# Altium PCB MyFirstArduino.PcbDoc
Units mil, origin at the board's own origin, x right, y up, seen from the top; angles counter-clockwise.
Board outline 730 x 1700 mil, 6 copper layers (Top Layer, 5V, Signal Layer Top, Signal Layer Bottom, GND, Bottom Layer), stack 48.468 mil thick; 25 components, 41 nets, 165 pads, 73 vias.
Unrouted connection lines stored in the file: 3.
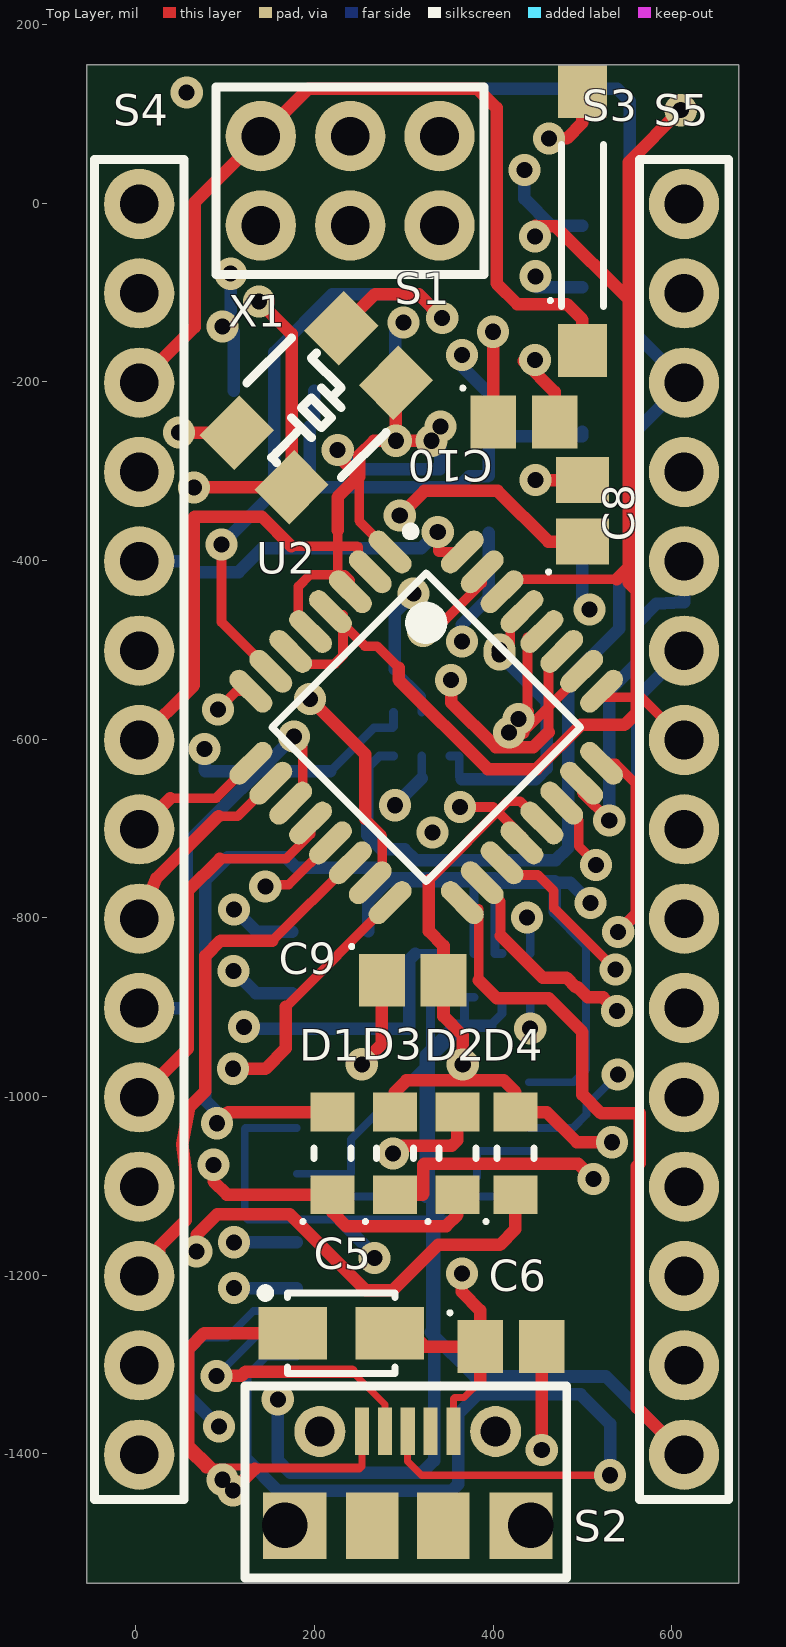
[diagram p0: Top Layer view]
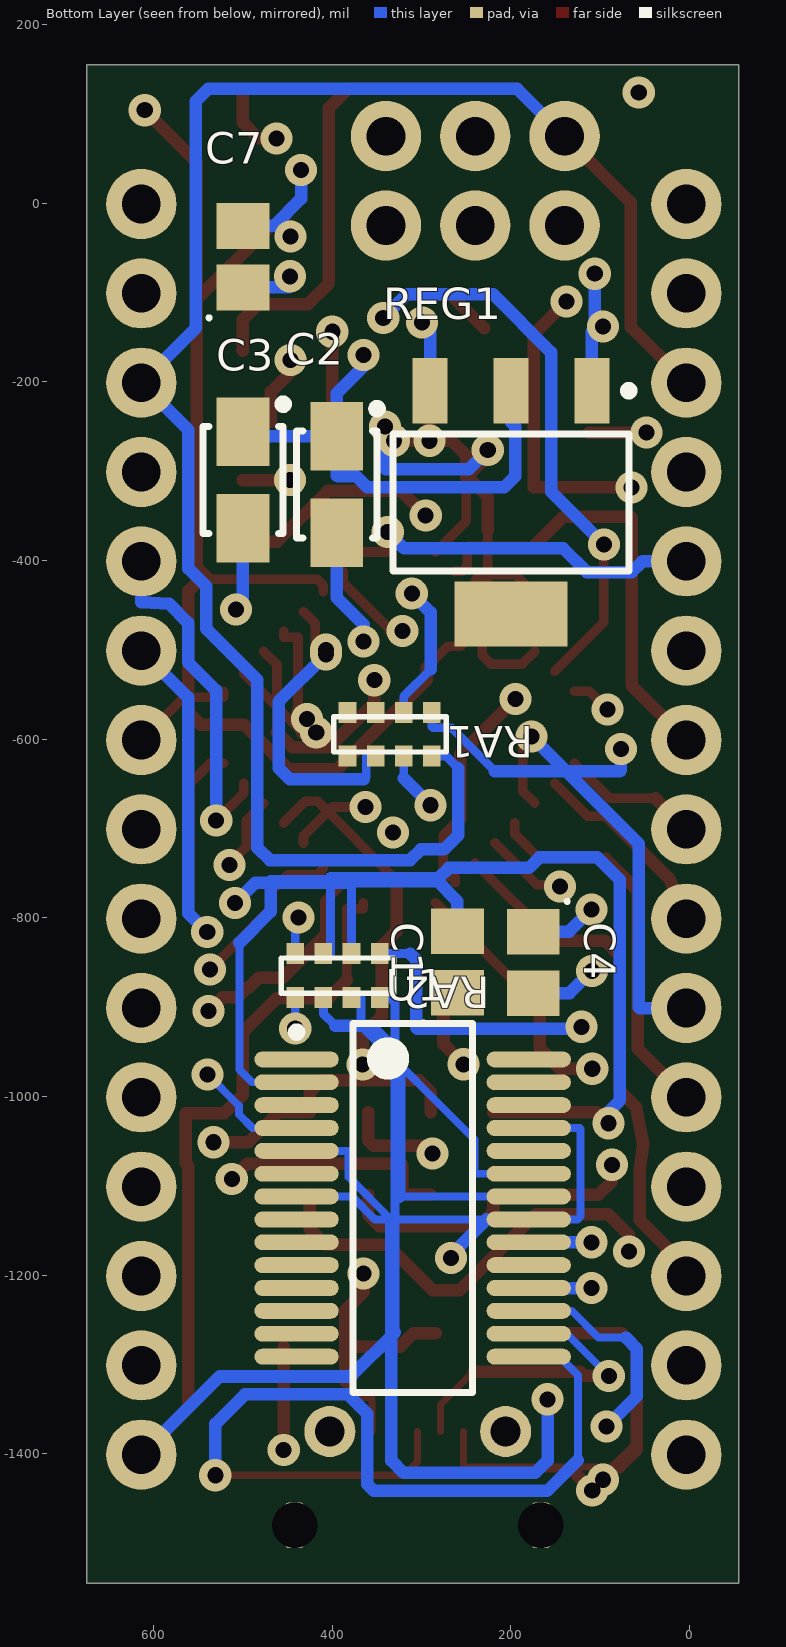
[diagram p1: Bottom Layer view, seen from below]
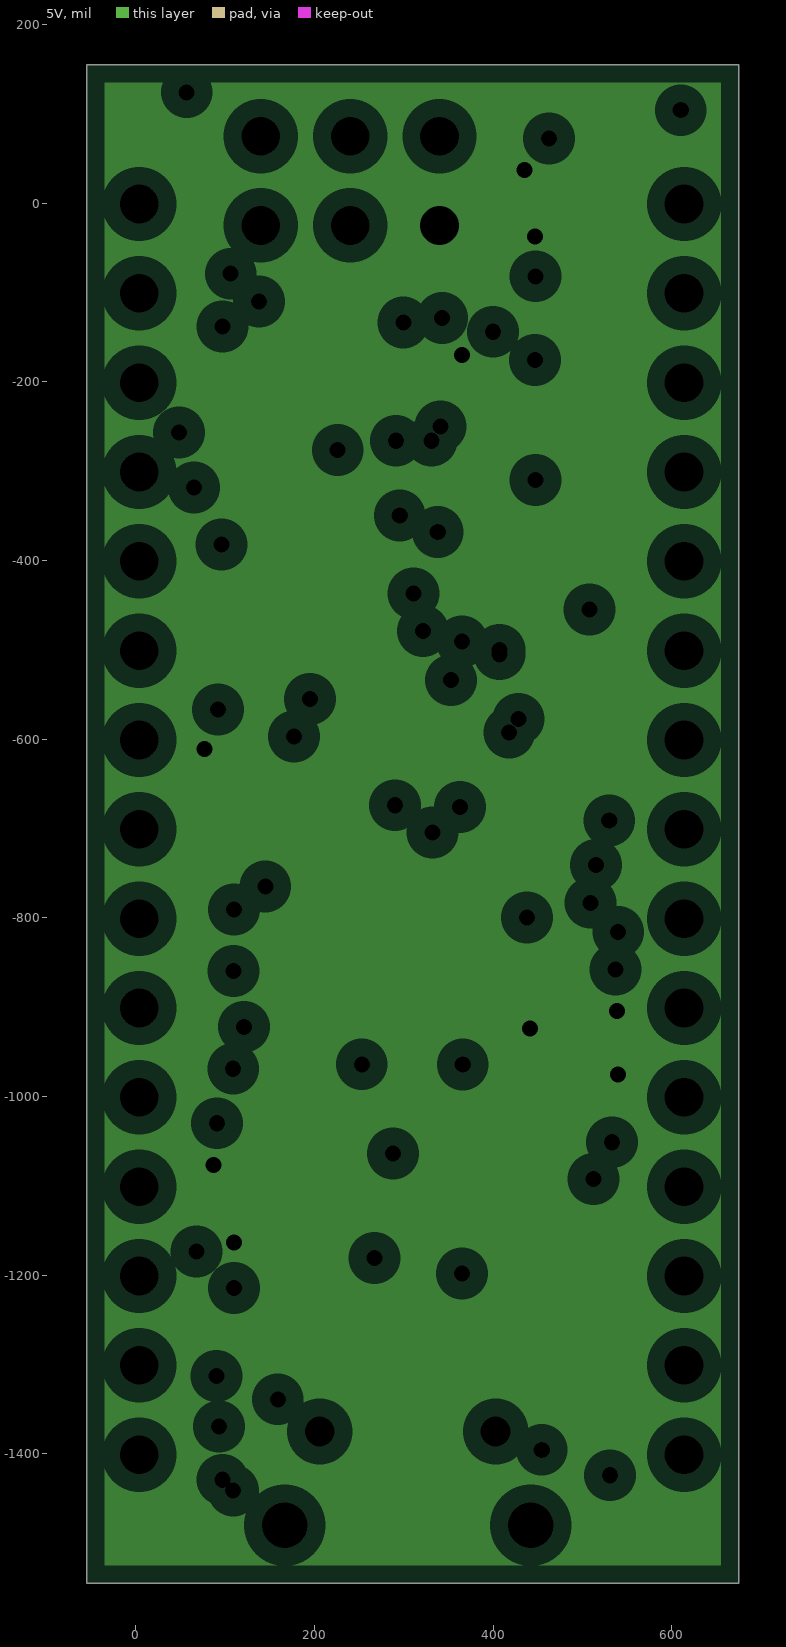
[diagram p2: 5V, clearances drawn from the general rule]
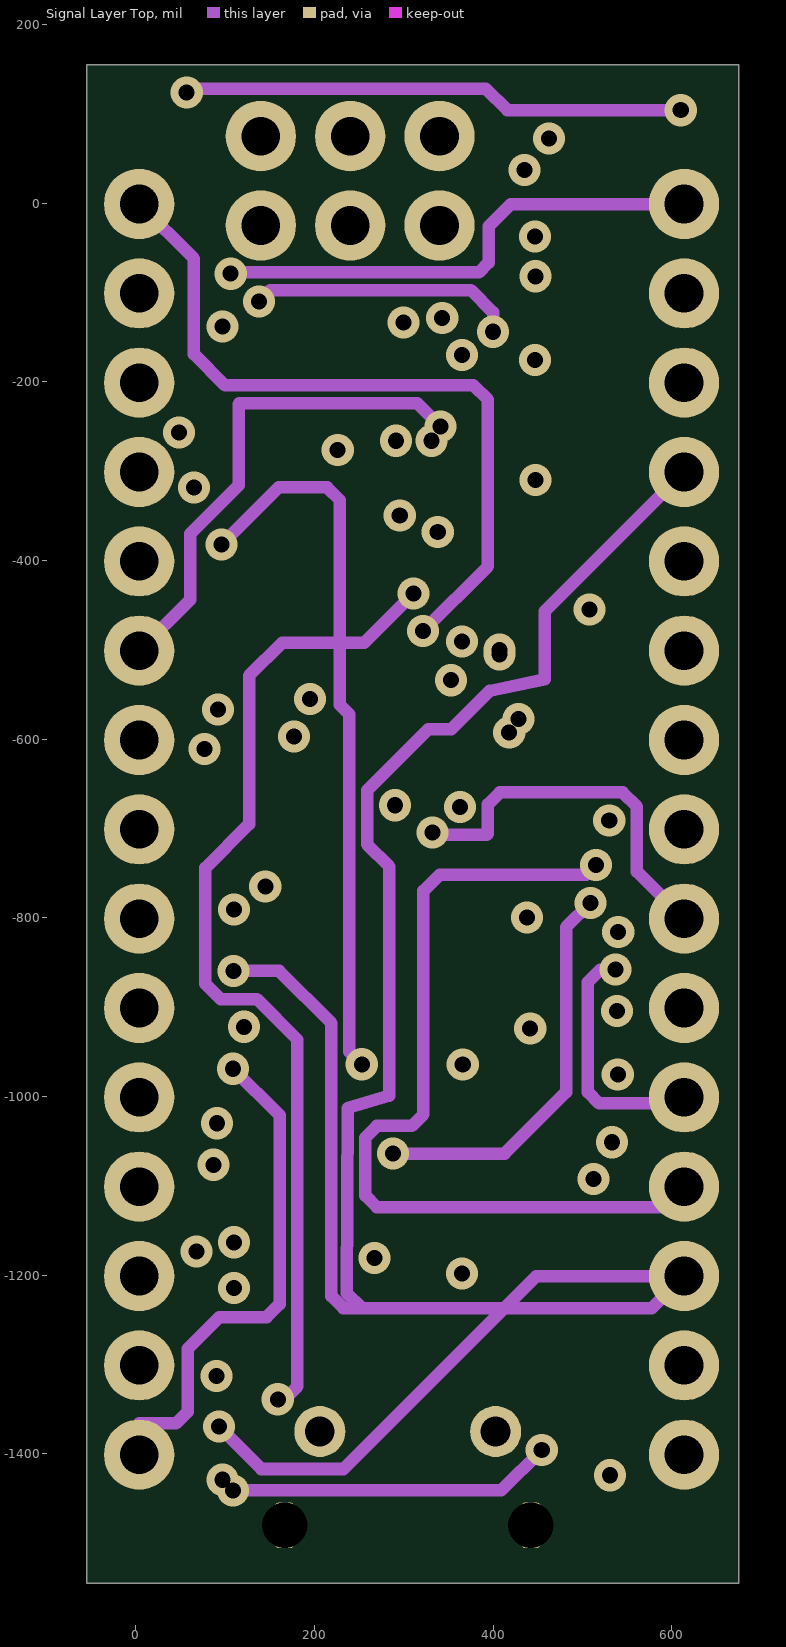
[diagram p3: Signal Layer Top]
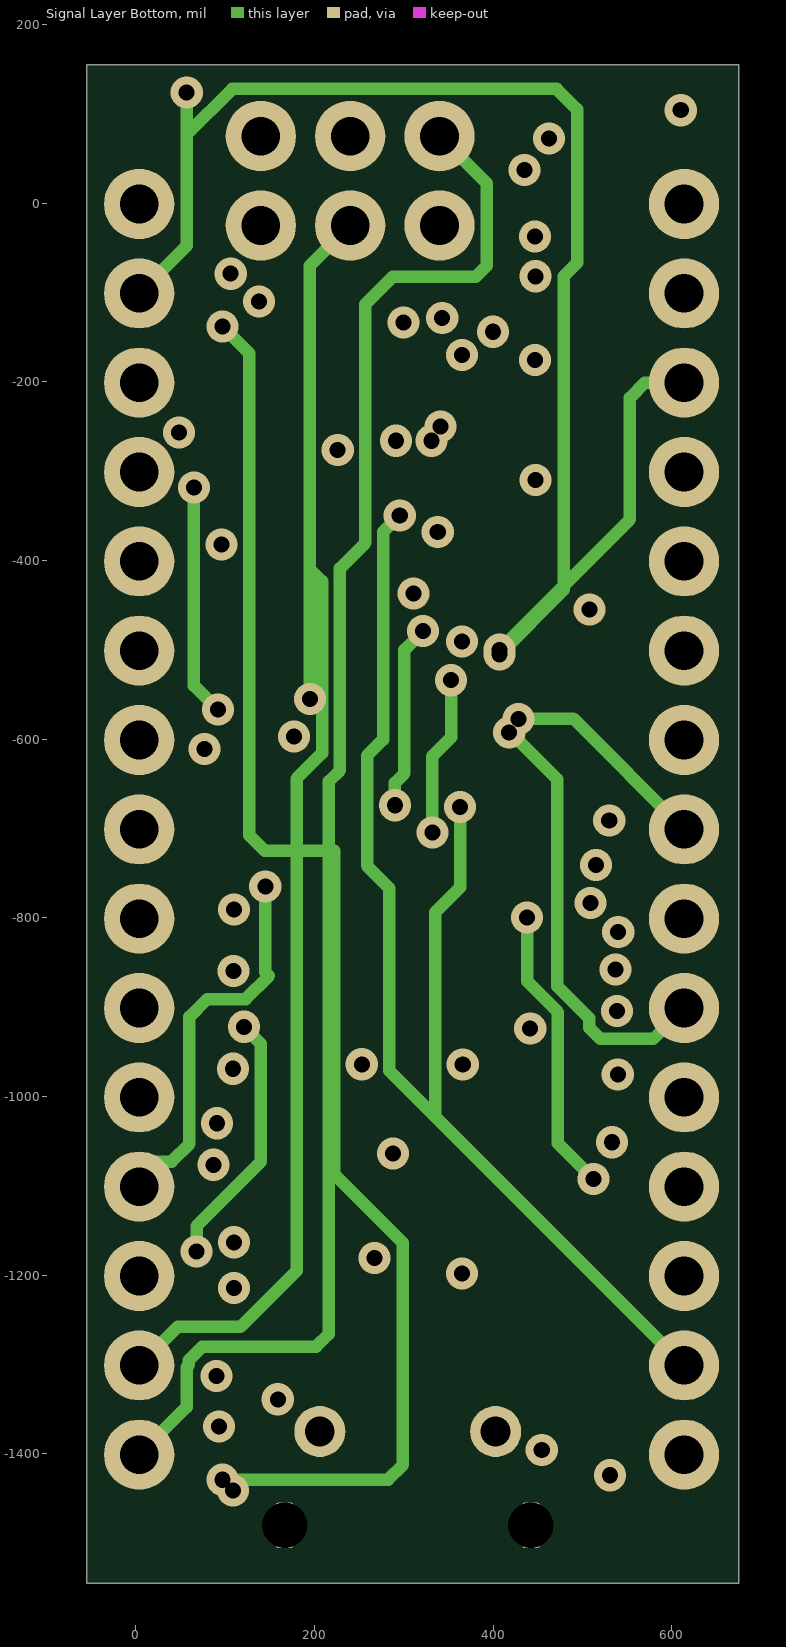
[diagram p4: Signal Layer Bottom]
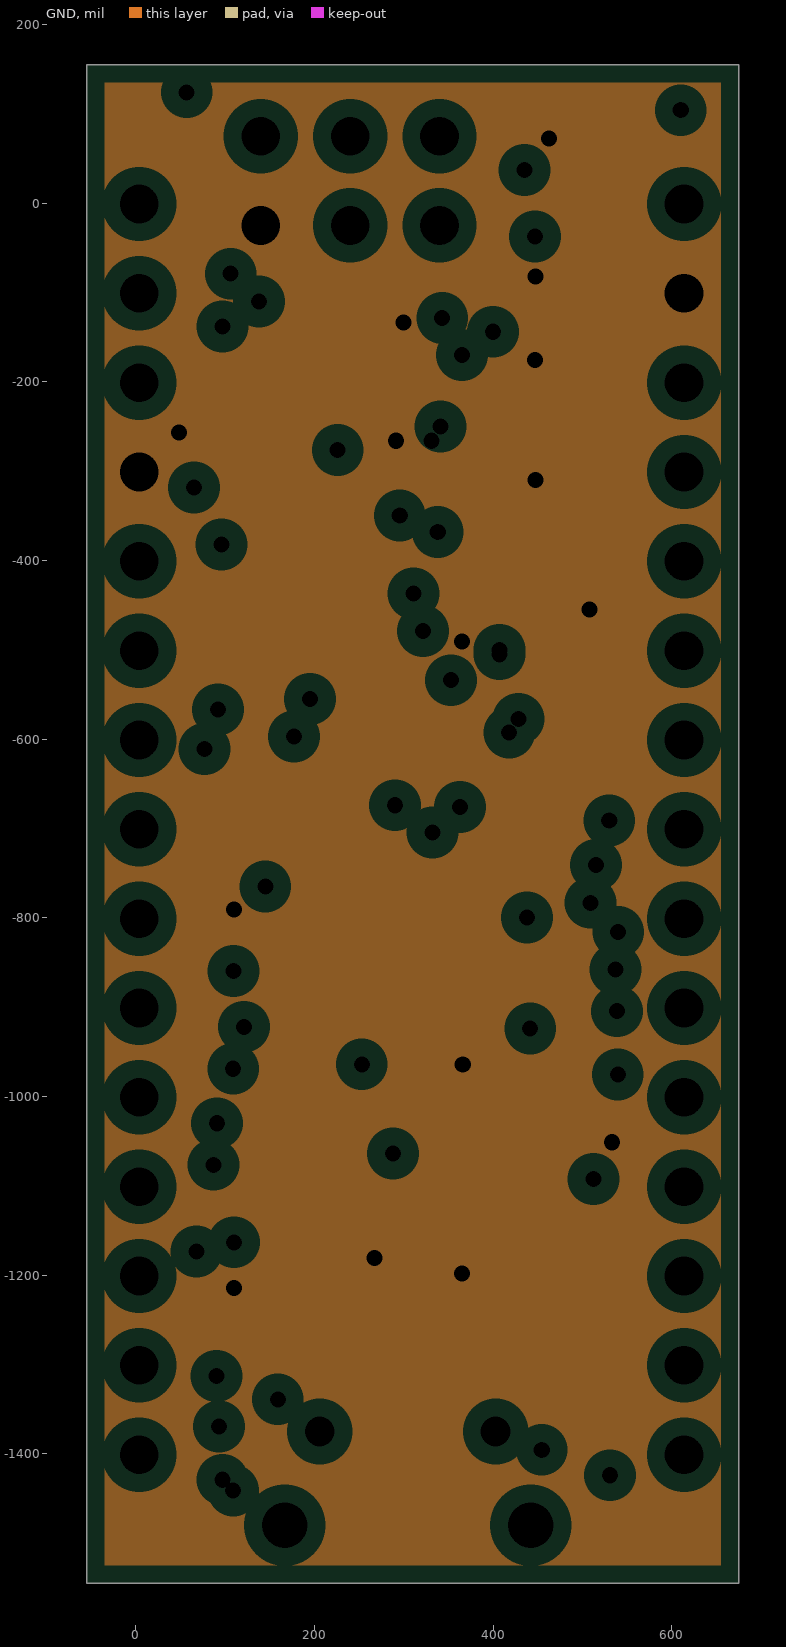
[diagram p5: GND, clearances drawn from the general rule]

## Layer stack, top to bottom
Top Solder: solder mask 0.4, Solder Resist, Dk 3.5
Top Layer: signal copper 1.4
Dielectric 1: core 10, FR-4, Dk 4.2
5V: plane copper 1.417, net 5V
Dielectric 3: core 10, Dk 4.2
Signal Layer Top: signal copper 1.417
Dielectric 4: prepreg 5, Dk 4.2
Signal Layer Bottom: signal copper 1.417
Dielectric 2: core 10, Dk 4.2
GND: plane copper 1.417, net GND
Dielectric 5: prepreg 5, Dk 4.2
Bottom Layer: signal copper 1.4
Bottom Solder: solder mask 0.4, Solder Resist, Dk 3.5

## Board outline
-55,-1545 675,-1545 675,155 -55,155

## Design rules (kind name [scope] priority, off if disabled: settings)
Clearance Clearance_3 [IsBoardOutline  Or IsBoardCutoutRegion vs Hole] p1: gap=39.37 ignorepadtopadclearanceinfootprint=FALSE except(0: Arc-Hole Track-Hole SMDPad-Hole THPad-Hole Via-Hole Fill-Hole Poly-Hole Region-Hole Text-Hole)
Clearance Clearance_2 [IsBoardOutline] p2: gap=19.68 ignorepadtopadclearanceinfootprint=FALSE except(0: Arc-Hole Track-Hole SMDPad-Hole THPad-Hole Via-Hole Fill-Hole Poly-Hole Region-Hole Text-Hole)
Clearance Clearance_1 [OnMid And IsVia] p3: gap=16 ignorepadtopadclearanceinfootprint=FALSE except(0: Arc-Hole Track-Hole SMDPad-Hole THPad-Hole Via-Hole Fill-Hole Poly-Hole Region-Hole Text-Hole)
Clearance [All] p4: gap=6 ignorepadtopadclearanceinfootprint=FALSE except(0: Arc-Hole Track-Hole SMDPad-Hole THPad-Hole Via-Hole Fill-Hole Poly-Hole Region-Hole Text-Hole)
HoleSize [All] p1: absolutevalues=TRUE maxlimit=137 minlimit=9.84 maxpercent=80.000 minpercent=20.000
HoleSize Testpoint [All] p2: absolutevalues=TRUE maxlimit=100 minlimit=1 maxpercent=80.000 minpercent=20.000
HoleSize TestPointUsage [All] p3: absolutevalues=TRUE maxlimit=100 minlimit=1 maxpercent=80.000 minpercent=20.000
HoleToHoleClearance [All] p1: gap=11.81 allowstackedmicrovias=TRUE
MinimumAnnularRing [All] p1: minimumring=6
MinimumSolderMaskSliver [All] p1: minsoldermaskwidth=5
MinimumSolderMaskSliver SilkscreenOverComponentPads [All] p2 off: minsoldermaskwidth=10
NetAntennae [All] p1: netantennaetolerance=10
PlaneClearance [All] p1: clearance=20
PlaneConnect [All] p1: planeconnectstyle=Relief reliefexpansion=20 reliefentries=4 reliefconductorwidth=10 reliefairgap=10
PolygonConnect [All] p1: connectstyle=Relief reliefconductorwidth=10 reliefentries=4 polygonreliefangle="90 Angle" airgapwidth=10
RoutingVias [All] p1: holewidth=18 width=36 viastyle="Through Hole" minholewidth=5.91 minwidth=12 maxholewidth=137 maxwidth=160
SMDNeckDown [All] p1: percent=50.000
SolderMaskExpansion [All] p1: expansion=8
UnConnectedPin [All] p1:
Width [All] p1: maxlimit=200 minlimit=6 preferedwidth=14
24 further rules are at their usual default settings.

## Components (designator, comment, footprint, x,y, rotation, side; value= is the part's Value field where it differs from the comment)
C1 "100nF Ceramic Multilayer Capacitor_1" CAPCP2012X09N 260,-849.45 r90 bottom
C2 "Capacitor SMT Tantalum" "CASE A - 3216X18" 395,-315 r270 bottom value=4.7µF
C3 "Capacitor SMT Tantalum" "CASE A - 3216X18" 500,-310 r270 bottom value=4.7µF
C4 "100nF Ceramic Multilayer Capacitor_1" CAPCP2012X09N 175,-850 r270 bottom
C5 "Capacitor SMT Tantalum" "CASE A - 3216X18" 230,-1265 r0 top value=4.7µF
C6 "100nF Ceramic Multilayer Capacitor_1" CAPCP2012X09N 420,-1280 r0 top
C7 "100nF Ceramic Multilayer Capacitor_1" CAPCP2012X09N 500,-60 r90 bottom
C8 "100nF Ceramic Multilayer Capacitor_1" CAPCP2012X09N 500,-344.45 r90 top
C9 "C0805C180J5GACTU" CAPCP2012X09N 310,-870 r0 top
C10 "C0805C180J5GACTU" CAPCP2012X09N 434.45,-245 r0 top
D1 "Kingbright Green LED, 70 mcd 120 ° 0805" LED1913X12NGREEN 220,-1063.74 r90 top
D2 "Kingbright Red LED, 100 mcd 120 ° 0805" LED1913X12NRED 360,-1063.74 r90 top
D3 "Kingbright Blue LED, 60 mcd 120 ° 0805" LED1913X12NBLUE 290,-1063.74 r90 top
D4 "Kingbright Orange LED, 200 mcd 120 ° 0805" LED1913X12NYEL/ORANGE 425,-1063.74 r90 top
RA1 "1k +- 5% SMT Resistor Array" "1206 RA" 288.5,-614 r0 bottom
RA2 "680+- 5% SMT Resistor Array" "1206 RA" 347.01,-884 r0 bottom
REG1 "LM1117MP-5.0/NOPB, Low Dropout Voltage Regulator, 1.5A, 5 V ±1%, 4-Pin SOT-223" SOT230P700X180-4N 200,-335 r270 bottom
S1 "Programming Headers Dual Row" "ISP HEADER" 1035,-480 r180 top
S2 "NewMolex Right Angle SMT Female Type B Micro USB Connector, 30 V ac, 1.8A" MicroUSB 255.98,-1375 r0 top
S3 "Button Tactile Switch, NO 0.05 A 0.8mm" Button8014X17N 500,-25 r90 top
S4 "connector;str header;single row;.1 cont centers;.095 tail;gold or gtx;36 contact" Header 3.74,-1 r270 top
S5 "connector;str header;single row;.1 cont centers;.095 tail;gold or gtx;36 contact" Header 613.74,-1 r270 top
U1 "FT232RL, Universal Asynchronous Receiver & Transmitter 3MBd, 28-Pin, SSOP" SOP65P780X200-28N 310.08,-1124.84 r180 bottom
U2 "ATMEGA328P-AU" TQFP80P900X900X120-32N 325.09,-586.72 r315 top
X1 "Aker 16MHz Crystal SMT" "Aker S5C Crystal" 230,-140 r45 top value=16MHz

## Footprints (in the part's own frame and the unit in brackets; to place one, negate y for a bottom-side part, rotate by r counter-clockwise, add the part's x,y. Pads: shape width x height; smd on the part's side, far side on the other; paste and mask are expansions set on the pad)
"1206 RA" [mm]
  rect 0.5x0.6 smd: 1(0,0.127) 2(0.8,0.127) 3(1.6,0.127) 4(2.4,0.127) 5(0,-1.118) 6(0.8,-1.118) 7(1.6,-1.118) 8(2.4,-1.118)
  silkscreen extent -0.41,-0.99 2.79,0.01, body extent -0.41,-1.31 2.79,0.29, height 0.5
"Aker S5C Crystal" [mm]
  rect 1.6x1.4 smd: 1(0,0) 2(-4.2,0) 3(0,-2.2) 4(-4.2,-2.2)
  round 0.254 on Top Overlay: 5(-3,-2.4)
  silkscreen extent -4,-3 -1,0.8, body extent -4.7,-2.8 0.5,0.6, height 1
Button8014X17N [mm] "Chip Inductor, 2-Leads, Body 8.00x1.40mm, IPC Medium Density"
  rect 1.5x1.4 smd: 1(-3.556,0) 2(3.81,0)
  silkscreen extent -2.3,-0.6 2.3,0.96, body extent -3.79,-1.92 4.21,1.78, height 2.5
CAPCP2012X09N [mm] "Chip Capacitor, 2-Leads, Body 2.00x1.25mm, IPC Medium Density"
  rect 1.3x1.5 smd: 1(-0.875,0) 2(0.875,0)
  silkscreen extent -1.79,0.91 -1.69,1.01, body extent -1.05,-0.57 0.95,0.68, height 0.78
"CASE A - 3216X18" [mm] "Molded Capacitor, 2-Leads, Body 3.2x1.6mm, IPC Medium Density"
  rect 1.95x1.5 smd: 1(-1.375,0) 2(1.375,0)
  silkscreen extent -2.28,-1.14 1.52,1.27, body extent -1.52,-0.76 1.65,0.84, height 1.77
Header [mm] "SIL Header"
  round 2 hole 1.1: 1(0,0) 2(2.54,0) 3(5.08,0) 4(7.62,0) 5(10.16,0) 6(12.7,0) 7(15.24,0) 8(17.78,0) 9(20.32,0) 10(22.86,0) 11(25.4,0) 12(27.94,0) 13(30.48,0) 14(33.02,0) 15(35.56,0)
  silkscreen extent -1.27,-1.27 36.83,1.27, body extent -1.33,-1.35 36.93,1.35, height 8.6
"ISP HEADER" [mm] "SIL Header for programming"
  round 2 hole 1.1: 1(17.653,-14.097) 2(17.653,-11.557) 3(20.193,-14.097) 4(20.193,-11.557) 5(22.733,-14.097) 6(22.733,-11.557)
  silkscreen extent 16.38,-15.49 24,-10.16, body extent 16.38,-15.37 24,-10.29, height 8
LED1913X12NBLUE [mm] "LED 2-Leads, Body 1.90x1.32mm, IPC Medium Density"
  rect 1.1x1.25 smd: 1(-1.175,0) 2(1.175,0)
  silkscreen extent -1.99,-0.53 0.15,0.89, body extent -1,-0.62 1.02,0.62, height 1.1
LED1913X12NGREEN [mm] "LED 2-Leads, Body 1.90x1.32mm, IPC Medium Density"
  rect 1.1x1.25 smd: 1(-1.175,0) 2(1.175,0)
  silkscreen extent -1.99,-0.53 0.15,0.89, body extent -1.01,-0.62 1.01,0.63, height 1.1
LED1913X12NRED [mm] "LED 2-Leads, Body 1.90x1.32mm, IPC Medium Density"
  rect 1.1x1.25 smd: 1(-1.175,0) 2(1.175,0)
  silkscreen extent -1.99,-0.53 0.15,0.89, body extent -1.02,-0.43 1.04,0.47, height 0.85
LED1913X12NYEL/ORANGE [mm] "LED 2-Leads, Body 1.90x1.32mm, IPC Medium Density"
  rect 1.1x1.25 smd: 1(-1.175,0) 2(1.175,0)
  silkscreen extent -1.99,-0.53 0.15,0.89, body extent -1.01,-0.62 1.01,0.63, height 1.1
MicroUSB [mm] "MicroUSB  Molex 5Pin"
  rect 0.4x1.35 smd: 1(-0.07,0) 2(0.58,0) 3(1.23,0) 4(1.88,0) 5(2.53,0)
  rrect50% 0.6x1.3 hole 1.3: ""(-2.27,-2.667) ""(-2.27,-2.667) ""(4.73,-2.667)
  rect 1.8x1.9 smd: ""(-1.98,-2.678) ""(4.45,-2.678)
  round 1.45 hole 0.85: ""(-1.27,0) ""(3.73,0)
  rect 1.5x1.9 smd: ""(0.218,-2.678) ""(2.242,-2.678)
  silkscreen extent -3.39,-4.17 5.75,1.3, body extent -2.83,-5.32 5.37,0.11, height 2.68
SOP65P780X200-28N [mm] "SOP, 28-Leads, Body 10.20x5.30mm, Pitch 0.65mm, IPC Medium Density"
  oval 2.4x0.45 smd: 1(-3.3,4.225) 2(-3.3,3.575) 3(-3.3,2.925) 4(-3.3,2.275) 5(-3.3,1.625) 6(-3.3,0.975) 7(-3.3,0.325) 8(-3.3,-0.325) 9(-3.3,-0.975) 10(-3.3,-1.625) 11(-3.3,-2.275) 12(-3.3,-2.925) 13(-3.3,-3.575) 14(-3.3,-4.225) 15(3.3,-4.225) 16(3.3,-3.575) 17(3.3,-2.925) 18(3.3,-2.275) 19(3.3,-1.625) 20(3.3,-0.975) 21(3.3,-0.325) 22(3.3,0.325) 23(3.3,0.975) 24(3.3,1.625) 25(3.3,2.275) 26(3.3,2.925) 27(3.3,3.575) 28(3.3,4.225)
  silkscreen extent -3.43,-5.25 1.7,5.25, body extent -3.91,-5.1 3.91,5.1, height 2
SOT230P700X180-4N [mm] "SOT223, 4-Leads, Body 6.50x7.00mm (avg), Pitch 2.30mm, IPC Medium Density"
  rect 1.85x1 smd: 1(-3.175,2.3) 2(-3.175,0) 3(-3.175,-2.3)
  rect 1.85x3.2 smd: 4(3.175,0)
  silkscreen extent -3.3,-3.35 1.95,3.47, body extent -3.8,-3.12 3.29,3.38, height 1.65
TQFP80P900X900X120-32N [mm] "TQFP, 32-Leads, Body 7.00x7.00mm, Pitch 0.80mm, IPC Medium Density"
  oval 1.5x0.55 smd: 1(-4.25,2.8) 2(-4.25,2) 3(-4.25,1.2) 4(-4.25,0.4) 5(-4.25,-0.4) 6(-4.25,-1.2) 7(-4.25,-2) 8(-4.25,-2.8) 17(4.25,-2.8) 18(4.25,-2) 19(4.25,-1.2) 20(4.25,-0.4) 21(4.25,0.4) 22(4.25,1.2) 23(4.25,2) 24(4.25,2.8)
  oval 0.55x1.5 smd: 9(-2.8,-4.25) 10(-2,-4.25) 11(-1.2,-4.25) 12(-0.4,-4.25) 13(0.4,-4.25) 14(1.2,-4.25) 15(2,-4.25) 16(2.8,-4.25) 25(2.8,4.25) 26(2,4.25) 27(1.2,4.25) 28(0.4,4.25) 29(-0.4,4.25) 30(-1.2,4.25) 31(-2,4.25) 32(-2.8,4.25)
  silkscreen extent -4.37,-3.1 3.1,3.75, body extent -3.5,-3.5 3.5,3.5, height 1.2

## Part data
C1 C4 C6 C7 C8: "AVX 0805 Standard 100nF Ceramic Multilayer Capacitor, 50 V dc X7R Dielectric ±10% SMD", Capacitance=100nF, Manufacturer=AVX, Package=0805, Voltage=50V, Creator="Ritesh Kanjee", Datasheet URL=http://za.rs-online.com/web/p/ceramic-multilayer-capacitors/4646688/, Date Created="18 February 2015", RS Stock No.=464-6688
C2 C3 C5: library part "4.7µF Tant RS 496-3545", "Capacitor,tantalum,SMT,16V,4.7uF,10%,A-case", Package=3216-18, Tolerance=10%, Voltage=16V, ComponentLink1Description="Supplier Website", ComponentLink1URL=http://za.rs-online.com/web/search/searchBrowseAction.html?method=getProduct&R=4963545, ComponentLink2Description="RS Data sheet", ComponentLink2URL=http://docs-europe.origin.electrocomponents.com/webdocs/04ed/0900766b804ed4cc.pdf, LatestRevisionDate=28-April-2010, Part Originator="H Theron", Publisher=DPSS, RS Stock Nr.=496-3545
C9 C10: library part "18pF Ceramic Multilayer Capacitor, 50 V dc C0G Dielectric ±5% SMD", "18pF Ceramic Multilayer Capacitor, 50 V dc C0G Dielectric ±5% SMD", Capacitance=18pF, Manufacturer=Kemet, Package=0805, Voltage=50V, Creator="Ritesh Kanjee", Datasheet URL=http://za.rs-online.com/web/p/ceramic-multilayer-capacitors/6480935/?searchTerm=C0805C180J5GACTU&relevancy-data=636F3D3226696E3D4931384E4B6E6F776E41734D504E266C753D656E266D6D3D6D61746368616C6C7061727469616C26706D3D5E5B5C707B4C7D5C707B4E647D2D2C2F255C2E5D2B2426706F3D313326736E3D592673743D4D414E5F504152545F4E554D4245522677633D424F5448267573743D4330383035433138304A35474143545526, Date Created="18 February 2015", RS Stock No.=648-0935
D1: Color=Green, Forward Voltage="2.1 V", Manufacturer=KingBright, Manufacturer Part No.=KP-2012MGC, Creator="Ritesh Kanjee", Datasheet URL=http://za.rs-online.com/web/p/visible-leds/4663778/, Date Created="18 February 2015", RS Stock No.=466-3778
D2: Color=RED, Forward Voltage=1.85V, Manufacturer=KingBright, Manufacturer Part No.=KP-2012SRC-PRV, Creator="Ritesh Kanjee", Datasheet URL=http://za.rs-online.com/web/p/visible-leds/4663813/, Date Created="18 February 2015", RS Stock No.=466-3813
D3: Color=Blue, Forward Voltage=3.2V, Manufacturer=KingBright, Manufacturer Part No.=KP-2012PBC-A, Creator="Ritesh Kanjee", Datasheet URL=http://za.rs-online.com/web/p/visible-leds/4663784/, Date Created="18 February 2015", RS Stock No.=466-3784
D4: Color=Orange, Forward Voltage=1.85V, Manufacturer=KingBright, Manufacturer Part No.=KP-2012SEC, Creator="Ritesh Kanjee", Datasheet URL=http://za.rs-online.com/web/p/visible-leds/4663790/, Date Created="18 February 2015", RS Stock No.=466-3790
RA1: "1k +- 5% SMT Resistor Array 4 Res", Manufacturer=Bourns, Manufacturer Part No.=CAY16-102J4LF, Creator="R Kanjee", Date Created="25 February 2015", RS Stock No.=552-5579, Wattage=0.25W
RA2: library part "680 +- 5% SMT Resistor Array 4 Res 1206", "680 +- 5% SMT Resistor Array 4 Res 1206", Manufacturer=Bourns, Manufacturer Part No.=CAY16-681J4LF, Creator="R Kanjee", Date Created="25 February 2015", RS Stock No.=552-5579, Wattage=0.25W
REG1: library part LM1117MP-5.0, Manufacturer="Texas Instruments", Maximum Input Voltage=15V, Output Voltage=5V, Supply Current=1.5Amps, Created By="R Kanjee", Datasheet URL=http://za.rs-online.com/web/p/low-dropout-voltage-regulators/5339583/, Date Created="26 February 2015", RS Stock No.=533-9583
S1: library part "Programming ISP, Programming Headers Dual Row", Current Rating="3Amps Continuous", Manufacturer=FCI, Manufacturer Part No.=68000-236HLF, Created By="R Kanjee", Date Created="1 March 2015", RS Stock No.=2509565626
S2: library part "Micro USB Connector, 30 V ac, 1.8A", Manufacturer=Molex, Manufacturer Part No.=105017-0001, Max Current=1.8A, Max Voltage=30V, Creator="R Kanjee", Datasheet URL=http://za.rs-online.com/web/p/micro-usb-connectors/8486764/, Date Created="28 February 2015", RS Stock No=848-6764
S3: Manufacturer="C & K", Manufacturer Part No.=B3F1000, Creator="R Kanjee", Date Created="25 February 2015", RS Stock No.=516-255, State="Normaly Open"
S4 S5: library part "Single row; PCB headers", Current Rating="3Amps Continuous", Manufacturer=FCI, Manufacturer Part No.=68000-236HLF, Created By="R Kanjee", Date Created="1 March 2015", RS Stock No.=2509565626
U1: library part "FT232RL USB to UART, Universal Asynchronous Receiver & Transmitter 3MBd, 28-Pin, SSOP", Manufacturer="FTDI Chip", Manufacturer Part No.=FT232RL, Creator="R Kanjee", Date Created="03 March 2015", Pin Count=28, RS Stock No.=406-580
U2: "Microchip Technology ATMEGA328P-AU, 8bit AVR Microcontroller, 20MHz, 32 kB Flash, 32-Pin TQFP", Create Date=2018, Created By="altay brusan", Datasheet URL=https://docs-emea.rs-online.com/webdocs/15b8/0900766b815b8e7b.pdf, RS Stock No.=131-0271
X1: library part "Aker  C5S-16.000-12-3030-X", "Aker S5C SMT Crystal", Frequency Stability=+/-30ppm, Load Capacitance=12pF, Manufacturer=Aker, Manufacturer Part #=C5S-16.000-12-3030-X, Package="3.2x5mm SMD", Creator="R Kanjee", HelpURL=http://za.rs-online.com/web/p/crystal-units/6719488/, RS="RS 671-9488", RS Stock Nr.=671-9488, Supplier=RS

## Via types
v1: diameter 36, hole 18, Top Layer to Bottom Layer, 73 vias

## Nets (pads, with @x,y where several pads share a name; then routed paths per layer and width w, separated by ;. In a path a pad name is that pad's centre, name@x,y a point inside that pad or via, vN(x,y) a via of type N, cw(c..) or ccw(c..) an arc to the next point about the centre after c; other vN are vias at no path point)
3V3: C4.2 S5.4 S5.13 U1.17 | length 2975
  Signal Layer Top w14: v1(93,-1369.5) 140.5,-1417 232.5,-1417 412.5,-1237 ; v1(109.5,-859.5) 160.5,-859.5 219,-918 219,-1223.5 232.5,-1237 253,-1237 ; S5.4 458,-456.74 458,-533 396,-546 353.15,-588.85 327.65,-588.85 259,-657.5 259,-717.75 284,-742.75 284,-999 237,-1013 236,-1220 253,-1237 ; 253,-1237 412.5,-1237 ; 412.5,-1237 577.74,-1237 S5.13 448.5,-1201 412.5,-1237
  Bottom Layer w8.86: 71.5,-1270 102,-1270 132,-1240 U1.17
  Bottom Layer w14: 71.5,-1270 59,-1282.5 59,-1335.5 v1(93,-1369.5) ; v1(109.5,-859.5) 134.45,-884.45 C4.2
5V: C2.1 C3.1 C7.2 D1.1 D2.1 RA1.5 RA2.4 REG1.2 S1.2 U1.4 U1.20 U2.4 U2.6 U2.18 | length 2966.2
  Top Layer w10.83: U2.6 187.56,-516 222.36,-516 232,-506.36 U2.4@232,-471.36 ; 294.34,-520 270.24,-495.91 256.55,-495.91 U2.4@232,-471.36 ; U2.18 408.34,-781.32 408.34,-820 ; U2.4@221.64,-461 217.91,-461 U2.4 U2.4@221.64,-461 ; U2.4@221.64,-461 U2.4@232,-471.36 ; U2.4@221.64,-461 232,-461 U2.4@232,-471.36
  Top Layer w14: v1(87.07,-1076.5) 87.07,-1095 102.07,-1110 D1.1 220,-1129.5 235.5,-1145 347.5,-1145 360,-1132.5 D2.1 ; 294.34,-520 294.34,-533.7 394.14,-633.5 448.82,-633.5 498.32,-584 547,-584 561,-570 561,-434 552,-425 552,-108 470,-26 447.5,-26 447,-25.5 v1(447,-37.5) ; 408.34,-820 455.34,-867 482,-867 493,-878 495,-878 506,-889 523,-889 v1(538.5,-904.5)
  Bottom Layer w8.86: U1.4 489.36,-1035.28 504.64,-1020 504.64,-1010.28 v1(539.57,-975.34)
  Bottom Layer w9.84: 217.92,-636 266.64,-587.28 287.22,-587.28 288.5,-586 RA1.5 ; v1(441.5,-923.81) RA2.4
  Bottom Layer w14: v1(77,-611) 77,-635 78,-636 217.92,-636 ; v1(109.91,-1163.23) U1.20 ; REG1.2 200,-245 195,-250 195,-305.5 207.5,-318 361,-318 373,-306 394,-306 395,-305 C2.1 ; v1(365,-170.15) 365,-182.65 395,-212.65 C2.1 ; v1(434.97,36.95) 434.97,5 465.52,-25.55 C7.2 ; C3.1 500,-261 448,-261 447.87,-260.87 C2.1
A0: S5.5 U2.23 | length 395.8
  Top Layer w10.83: U2.23 499.08,-660.08 v1(530,-691)
  Bottom Layer w14: v1(530,-691) 530,-545.37 561.37,-514 561.37,-469.76 582.5,-448.63 613.74,-447 S5.5
A1: S5.6 U2.24 | length 567.5
  Top Layer w10.83: U2.24 537.09,-627.09 559.41,-649.41 559.41,-796.59
  Top Layer w14: v1(540,-816) 559.41,-796.59
  Bottom Layer w14: v1(540,-816) 561.37,-794.63 561.37,-553.37 S5.6
A2: S5.7 U2.25 | length 118.9
  Top Layer w10.83: U2.25 521.36,-553 565.74,-553 S5.7
A3: S5.8 U2.26 | length 373.8
  Top Layer w10.83: v1@433.5,-592.58 499.08,-527 U2.26
  Top Layer w14: v1(418,-592.58) v1@433.5,-592.58
  Signal Layer Bottom w14: v1(418,-592.58) 418,-577 489.74,-577 S5.8
A4: S5.9 U2.27 | length 861.6
  Top Layer w10.83: 462,-592.03 462,-516.63 U2.27
  Top Layer w14: v1(353,-534) 353,-559 403,-609 445.03,-609 462,-592.03
  Signal Layer Top w14: v1(332,-704.5) 331.58,-704.92 332,-704.92 332,-706 333,-707 393,-707 394,-706 394,-673.09 407.5,-659.59 545,-659.59 561,-675.59 561,-748.26 S5.9
  Signal Layer Bottom w14: v1(332,-704.5) 332,-619.07 353,-598.07 v1(353,-534)
A5: S5.10 U2.28 | length 623.2
  Top Layer w10.83: v1@438.5,-569.5 438.5,-486 454.54,-486 U2.28
  Top Layer w14: v1(428.5,-577.5) 430.5,-577.5 v1@438.5,-569.5
  Signal Layer Bottom w14: v1(428.5,-577.5) 428.5,-601.5 472,-645 472,-876.71 507.5,-912.21 507.5,-923 520,-935.5 579.24,-935.5 S5.10
A6: S5.11 U2.19 | length 467.1
  Top Layer w10.83: U2.19 410,-745 417,-752 450,-752 468,-770 468,-789 v1(537,-858)
  Signal Layer Top w14: v1(537,-858) 520,-858 506,-872 506,-995 518.74,-1007.74 607,-1007.74 S5.11
A7: S5.12 U2.22 | length 1066.1
  Top Layer w10.83: U2.22 496,-690.82 496,-720 v1@515,-739
  Top Layer w14: v1(515,-741) v1@515,-739
  Signal Layer Top w14: v1(515,-741) 504,-752 340,-752 322,-770 322,-1020 309,-1033 270,-1033 257,-1046 257,-1111 270,-1124 613.74,-1124 S5.12
AREF: C8.1 S5.14 U2.20 | length 1801.4
  Top Layer w10.83: v1(363,-676) 400,-676 432.27,-708.27 U2.20
  Top Layer w14: v1(295.5,-349.5) 323,-322 405,-322 461.9,-378.9 C8.1
  Signal Layer Bottom w14: v1(295.5,-349.5) 277,-368 277,-600.46 259,-618.46 259,-742 284,-767 284,-971.26 335,-1022.26 ; v1(363,-676) 363,-766 335,-794 335,-1022.26 ; S5.14 335,-1022.26
D0/RX: RA1.3 S4.2 U2.30 | length 2905.4
  Top Layer w10.83: U2.30 410,-428 417,-421 538.5,-421
  Top Layer w14: 538.5,-421 552,-407.5 552,46 v1(610,104)
  Signal Layer Top w14: v1(57,124) 61,128 392,128 416,104 v1(610,104)
  Signal Layer Bottom w14: S4.2 57,-47.74 57,77 ; v1(57,124) 57,77 ; v1(407,-505) 479,-433 479,-82 494,-67 494,105 471,128 108,128 57,77
  Bottom Layer w9.84: RA1.3 361.5,-619 362,-619.5 362,-642 365,-645
  Bottom Layer w14: 365,-645 447.5,-645 460,-632.5 460,-558 v1(407,-505)
D1/TX: RA1.2 S4.1 U2.31 | length 1209
  Top Layer w10.83: v1@334,-479 387.73,-425.27 U2.31
  Top Layer w14: v1(321.5,-479) v1@334,-479
  Signal Layer Top w14: S4.1 65,-62.26 65,-169 100,-204 378,-204 394,-220 394,-406.5 v1(321.5,-479)
  Signal Layer Bottom w14: v1(290,-674) 290,-649 300.54,-638.46 300.54,-499.96 v1(321.5,-479)
  Bottom Layer w9.84: 320,-644 RA1.2
  Bottom Layer w14: v1(290,-674) 320,-644
D2: S4.5 U2.32 | length 407.2
  Top Layer w10.83: v1(338,-368) 338,-389.46 339,-390.46 U2.32
  Bottom Layer w14: S4.5 53,-401 65,-413 115,-413 141.5,-386.5 319.5,-386.5 v1(338,-368)
D3: S4.6 U2.1 | length 868.5
  Top Layer w10.83: 250,-306.5 250,-355.73 U2.1
  Top Layer w14: v1(226,-276.5) 226,-282.5 250,-306.5
  Signal Layer Top w14: S4.6 61,-443.74 61,-370 114.99,-316.01 114.99,-225 115.99,-224 315,-224 v1(341,-250)
  Bottom Layer w14: v1(226,-276.5) 247.25,-297.75 340,-297.75 341,-296.75 v1(341,-250)
D4: S4.7 U2.2 | length 511.1
  Top Layer w10.83: 174,-384 248,-384 249,-385 249,-407 254,-412 262.45,-412 U2.2
  Top Layer w14: S4.7 65,-539.74 65,-352 66,-351 141,-351 174,-384
D5: S4.8 U2.9 | length 155.7
  Top Layer w10.83: 38.65,-666.09 89.82,-666.09 U2.9
  Top Layer w14: S4.8 38.65,-666.09
D6: S4.9 U2.10 | length 221.3
  Top Layer w10.83: 92.62,-686.18 114.28,-686.18 U2.10
  Top Layer w14: S4.9 22.91,-755.89 92.62,-686.18
D7: S4.10 U2.11 | length 496.1
  Top Layer w10.83: U2.11 187,-658 v1@187,-598
  Top Layer w14: v1(177,-597) 186,-597 v1@187,-598
  Bottom Layer w14: S4.10 56,-901 57,-900 57,-717 v1(177,-597)
D8: S4.11 U2.12 | length 429.9
  Top Layer w10.83: 94.09,-733.91 168.09,-733.91 195.64,-706.36 U2.12
  Top Layer w14: S4.11 58,-946.74 58,-770 94.09,-733.91
D9: S4.12 U2.13 | length 537.4
  Top Layer w10.83: v1@150,-763 171.08,-763 U2.13
  Top Layer w14: v1(145,-765) 147,-763 v1@150,-763
  Signal Layer Bottom w14: S4.12 3.74,-1073 40,-1073 60,-1053 60,-911 80,-891 123,-891 149,-865 145,-861 v1(145,-765)
D10: S4.13 U2.14 | length 606.9
  Top Layer w10.83: 153,-825.63 U2.14
  Top Layer w14: S4.13 26,-1201 26,-1168.52 56.11,-1138.41 56.11,-1083.11 52,-1053.5 60,-1011.87 78,-993.87 78,-842.63 95,-825.63 153,-825.63
D11/MOSI: S1.4 S4.14 U2.15 | length 1824.1
  Top Layer w10.83: 257,-689 276,-708 276,-754 262.45,-754 U2.15
  Top Layer w14: v1(195,-555) 257,-617 257,-689
  Signal Layer Bottom w14: S4.14 46.74,-1258 117.18,-1258 180,-1195.18 180,-644.18 208.5,-615.68 208.5,-423.52 195,-410.02 ; v1(195,-555) 195,-410.02 ; S1.4 195,-70 195,-410.02
D12/MISO: S1.1 S4.15 U2.16 | length 2642.1
  Top Layer w10.83: 168,-899.71 U2.16
  Top Layer w14: v1(109,-969) 145,-969 168,-946 168,-899.71
  Signal Layer Top w14: S4.15 3.74,-1366 45,-1366 58,-1353 58,-1282.5 93.5,-1247 146.5,-1247 161,-1232.5 161,-1021 v1(109,-969)
  Signal Layer Bottom w14: S4.15 57,-1347.74 57,-1303 59.5,-1300.5 59.5,-1295 74.5,-1280 202,-1280 216,-1266 216,-647.36 228.5,-634.86 228.5,-408.86 257,-380.36 257,-113 287.5,-82.5 380.5,-82.5 393,-70 393,22 S1.1
D13/SCK: RA2.1 S1.3 S5.15 U2.17 | length 1522.3
  Top Layer w10.83: U2.17 365.46,-790 384,-790 384,-870
  Top Layer w14: 384,-870 404,-890 462,-890 500,-928 500,-997.84 521,-1018.84 563.84,-1018.84 564,-1019 564,-1075 561,-1078 561,-1348.26 S5.15
  Bottom Layer w9.84: 330,-1264 330,-895 336,-889 RA2.1
  Bottom Layer w14: 330,-1264 379.46,-1313.46 526.2,-1313.46 S5.15
GND: C2.2 C3.2 C4.1 C5.2 C6.1 C7.1 C8.2 C9.2 C10.2 D3.2 D4.2 REG1.3 S1.6 S2.5 S3.2 S4.4 S5.2 U1.7 U1.18 U1.21 U1.25 U2.3 U2.5 U2.21 X1.2 X1.3 | length 2842
  Top Layer w7.87: S2.5 355.59,-1338 356.59,-1337 367.55,-1337 385.55,-1319
  Top Layer w10.83: U2.5 182,-465.9 182,-429 195,-416 U2.3@226,-416 ; 226,-366 U2.3@226,-416 ; 328,-758 416.59,-669.41 430.05,-669.41 U2.21 ; U2.3@226,-416 226,-420.82 U2.3 240.18,-422.18 234,-416 U2.3@226,-416
  Top Layer w14: v1(48.32,-256.92) X1.2 ; 226,-366 226,-329 250,-305 250,-282.5 266.5,-266 v1(291.24,-266.01) ; C5.2 309,-1265 324,-1280 C6.1 ; D3.2 290,-995 303,-982 412,-982 425,-995 D4.2 459.92,-1017.48 493.68,-1051.24 v1(532.93,-1051.24) ; X1.3 v1(291.24,-266.01) ; 328,-758 328,-815 344.45,-831.45 C9.2 344.45,-910.16 366,-931.71 v1(366,-964.36) ; v1(331,-266) v1(291.24,-266.01) ; v1(365,-1198.14) 365,-1218.79 385.55,-1239.34 C6.1 ; 385.55,-1319 C6.1 ; v1(446.95,-175.64) 435,-175.64 434.45,-176.2 434.45,-176.84 468.9,-211.29 C10.2 ; v1(447.47,-310) C8.2 ; v1(462.5,72.47) 482.5,72.47 500,89.97 S3.2
  Bottom Layer w8.86: U1.25 123,-1035.28 122,-1036.28 122,-1134 125.64,-1137.64 U1.21 227.2,-1137.64 352.41,-1137.64 378,-1112.05 U1.7
  Bottom Layer w14: v1(109.91,-1214.41) U1.18 ; v1(109.97,-790.55) 134.97,-815.55 C4.1 ; U1.21@227.2,-1137.64 270.41,-1180.84 v1(267.23,-1180.84) ; REG1.3 290.55,-135 291.8,-133.75 v1(299.5,-133.75) ; v1(365,-490.85) 365,-471.93 395,-441.93 C2.2 ; v1(447.47,-81.95) 447.47,-93 448.92,-94.45 C7.1 ; C3.2 500,-446.85 v1(508,-454.85)
GREEN_TX: RA2.3 U1.22 | length 425.8
  Bottom Layer w8.86: U1.22 324.81,-1112.05
  Bottom Layer w9.84: 396.5,-921 410,-907.5 RA2.3
  Bottom Layer w14: 324.81,-1112.05 324.81,-953.69 357.5,-921 396.5,-921
NetC1_2: C1.2 U1.2 | length 547.2
  Bottom Layer w8.86: U1.2 489.91,-984.09 504,-970 504,-828
  Bottom Layer w14: C1.2 260,-781.5 282.5,-759 469,-759 469,-793 504,-828
NetC9_1: C9.1 U2.7 X1.1 | length 1679.7
  Top Layer w10.83: v1(96,-382) 96,-468.98 U2.7
  Top Layer w14: X1.1 268,-102 316.5,-102 v1(343,-128.5) ; v1(253,-964) 275.55,-941.45 C9.1
  Signal Layer Top w14: v1(96,-382) 159.77,-318.23 214.12,-318.23 228.5,-332.61 228.5,-561.74 239,-572.24 239,-950 v1(253,-964)
  Bottom Layer w14: v1(96,-382) 155,-323 155,-167 220,-102 316.5,-102 v1(343,-128.5)
NetC10_1: C10.1 U2.8 X1.4 | length 1038.1
  Top Layer w10.83: v1(92,-567) 112.64,-546.36 U2.8
  Top Layer w14: v1(65,-318.17) X1.4 174.32,-146.32 v1(138,-110) ; C10.1 v1(400,-144)
  Signal Layer Top w14: v1(138,-110) 150.5,-97.5 375.19,-97.5 400,-122.31 v1(400,-144)
  Signal Layer Bottom w14: v1(65,-318.17) 65,-540 v1(92,-567)
NetD1_2: D1.2 RA2.7 | length 848.6
  Top Layer w14: v1(91,-1029.98) 103.5,-1017.48 D1.2
  Bottom Layer w9.84: 402,-755.5 402,-840 RA2.7
  Bottom Layer w14: v1(91,-1029.98) 91,-1017.48 78,-1004.48 78,-757.5 103.18,-732.32 168.32,-732.32 180,-744 269.5,-744 281,-755.5 402,-755.5
NetD2_2: D2.2 RA2.6 | length 774.7
  Top Layer w14: v1(288,-1064) 296.66,-1055.34 353.66,-1055.34 360,-1049 D2.2
  Signal Layer Top w14: v1(288,-1064) 413,-1064 481.76,-995.24 481.76,-810.49 v1(509,-783.25)
  Bottom Layer w9.84: RA2.6 378.5,-760.5
  Bottom Layer w14: 378.5,-760.5 486.25,-760.5 v1(509,-783.25)
NetD3_1: D3.1 RA2.8 | length 628.9
  Top Layer w14: D3.1 321,-1110 322,-1109 322,-1076.34 323,-1075.34 495.34,-1075.34 v1(512.5,-1092.5)
  Signal Layer Bottom w14: v1(438,-799.49) 438,-871 472.5,-905.5 472.5,-1052.5 v1(512.5,-1092.5)
  Bottom Layer w9.84: RA2.8 v1@441.5,-802.99
  Bottom Layer w14: v1(438,-799.49) v1@441.5,-802.99
NetD4_1: D4.1 RA2.5 | length 1082.2
  Top Layer w14: v1(68,-1173.37) 68,-1155 91,-1132 172.5,-1132 257.5,-1217 287.5,-1217 338.5,-1166 407.5,-1166 425,-1148.5 D4.1
  Signal Layer Bottom w14: v1(68,-1173.37) 68,-1145 140,-1073 140,-941 v1(121,-922)
  Bottom Layer w9.84: 313,-840 RA2.5
  Bottom Layer w14: v1(121,-922) 123,-924 305,-924 306,-923 306,-847 313,-840
NetS2_2: S2.2 U1.16 | length 344.8
  Top Layer w7.87: 241.82,-1308 278.82,-1345 S2.2
  Top Layer w14: v1(90.5,-1312.75) 118.25,-1312.75 123,-1308 241.82,-1308
  Bottom Layer w8.86: v1(90.5,-1312.75) 137.66,-1265.59 U1.16
NetS2_3: S2.3 U1.15 | length 1007.6
  Top Layer w7.87: S2.3 304.41,-1408.41 320,-1424 v1(531,-1424)
  Bottom Layer w8.86: 125,-1407 125,-1312.18 146,-1291.18 U1.15
  Bottom Layer w14: 125,-1407 159.41,-1441.41 353.59,-1441.41 361,-1434 361,-1354.96 382.5,-1333.46 498,-1333.46 531,-1366.46 v1(531,-1424)
RED_RX: RA2.2 U1.23 | length 320.5
  Bottom Layer w8.86: U1.23 240,-1086.46 241,-1085.46 241,-1048 368,-921
  Bottom Layer w9.84: 368,-921 368,-889.5 368.5,-889 RA2.2
RESET: C1.1 RA1.1 S1.5 S3.1 S4.3 S5.3 U2.29 | length 3149.2
  Top Layer w10.83: v1(407,-500) 419,-500 419,-470.54 U2.29
  Top Layer w14: S4.3 65.95,-138.79 65.95,0.95 S1.5 193,128 382.5,128 403.97,106.53 403.97,-89.97 427,-113 482.5,-113 500,-130.5 S3.1
  Signal Layer Bottom w14: v1(407,-500) 553,-354 553,-218 570,-201 S5.3
  Bottom Layer w9.84: 259,-632.5 272.5,-619 RA1.1
  Bottom Layer w14: S1.5 193,128 539,128 553,114 553,-140.26 S5.3 561,-253.74 561,-409 541.37,-428.63 541.37,-476.18 483.87,-533.68 483.87,-721.63 470,-735.5 313,-735.5 301,-723.5 275,-723.5 259,-707.5 259,-632.5
RX: RA1.7 U1.1
TX: RA1.6 U1.5 | length 1965.4
  Signal Layer Top w14: v1(159,-1339) 166.5,-1339 181,-1324.5 181,-936.5 135.5,-891 95,-891 78,-874 78,-744 127,-695 127,-529 164,-492 256,-492 v1(311,-437)
  Bottom Layer w8.86: 334,-1138 382,-1090 382,-1061.87 383,-1060.87 U1.5
  Bottom Layer w9.84: 290,-522 320,-552 RA1.6
  Bottom Layer w14: v1(159,-1339) 159,-1407.5 172.91,-1421.41 320.09,-1421.41 334,-1407.5 334,-1138 ; 290,-522 290,-458 v1(311,-437)
VUSB: C5.1 C6.2 REG1.1 S2.1 S5.1 | length 3492
  Top Layer w7.87: 79,-1415 83,-1415 252.23,-1415 ; 133,-1417 250.23,-1417 252.23,-1415 ; S2.1 253.23,-1414 252.23,-1415
  Top Layer w14: 79,-1415 59,-1395 59,-1391 ; v1(97,-1429) 83,-1415 59,-1391 ; v1(109,-1441) 133,-1417 ; C5.1 76.5,-1265 59,-1282.5 59,-1391 ; v1(454.45,-1395.55) C6.2
  Signal Layer Top w14: v1(106.22,-79) 107.72,-77.5 384,-77.5 395,-66.5 395,-26 420,-1 S5.1 ; v1(109,-1441) 409,-1441 v1(454.45,-1395.55)
  Signal Layer Bottom w14: v1(97,-1429) 282.5,-1429 299,-1412.5 299,-1164 222,-1087 222,-725 144.5,-725 127,-707.5 127,-168 v1(97,-138)
  Bottom Layer w14: v1(97,-138) v1@109.45,-150.45 ; v1(106.22,-79) 106.22,-141 109.45,-144.22 v1@109.45,-150.45 ; REG1.1 v1@109.45,-150.45
pads on no net: RA1.4 RA1.8 REG1.4 S2. S2.4 U1.3 U1.6 U1.8 U1.9 U1.10 U1.11 U1.12 U1.13 U1.14 U1.19 U1.24 U1.26 U1.27 U1.28 X1.5

## Polygon pours and split planes (outlines as drawn)
GND on GND (split plane): 654.9,-1524.9 -34.9,-1524.9 -34.9,134.9 654.9,134.9
5V on 5V (split plane): 654.9,-1524.9 -34.9,-1524.9 -34.9,134.9 654.9,134.9

## Silkscreen, mask and mechanical layers (free items; w line width, h text height)
Mechanical 1:
  the board outline again, w10